# Altium PCB ADP32F036QN56Q_EVM_Rev1.1.PcbDoc
Units mm, origin at the board's own origin, x right, y up, seen from the top; angles counter-clockwise.
Board outline 85 x 53 mm, 2 copper layers (Top Layer, Bottom Layer); 90 components, 82 nets, 321 pads, 303 vias.
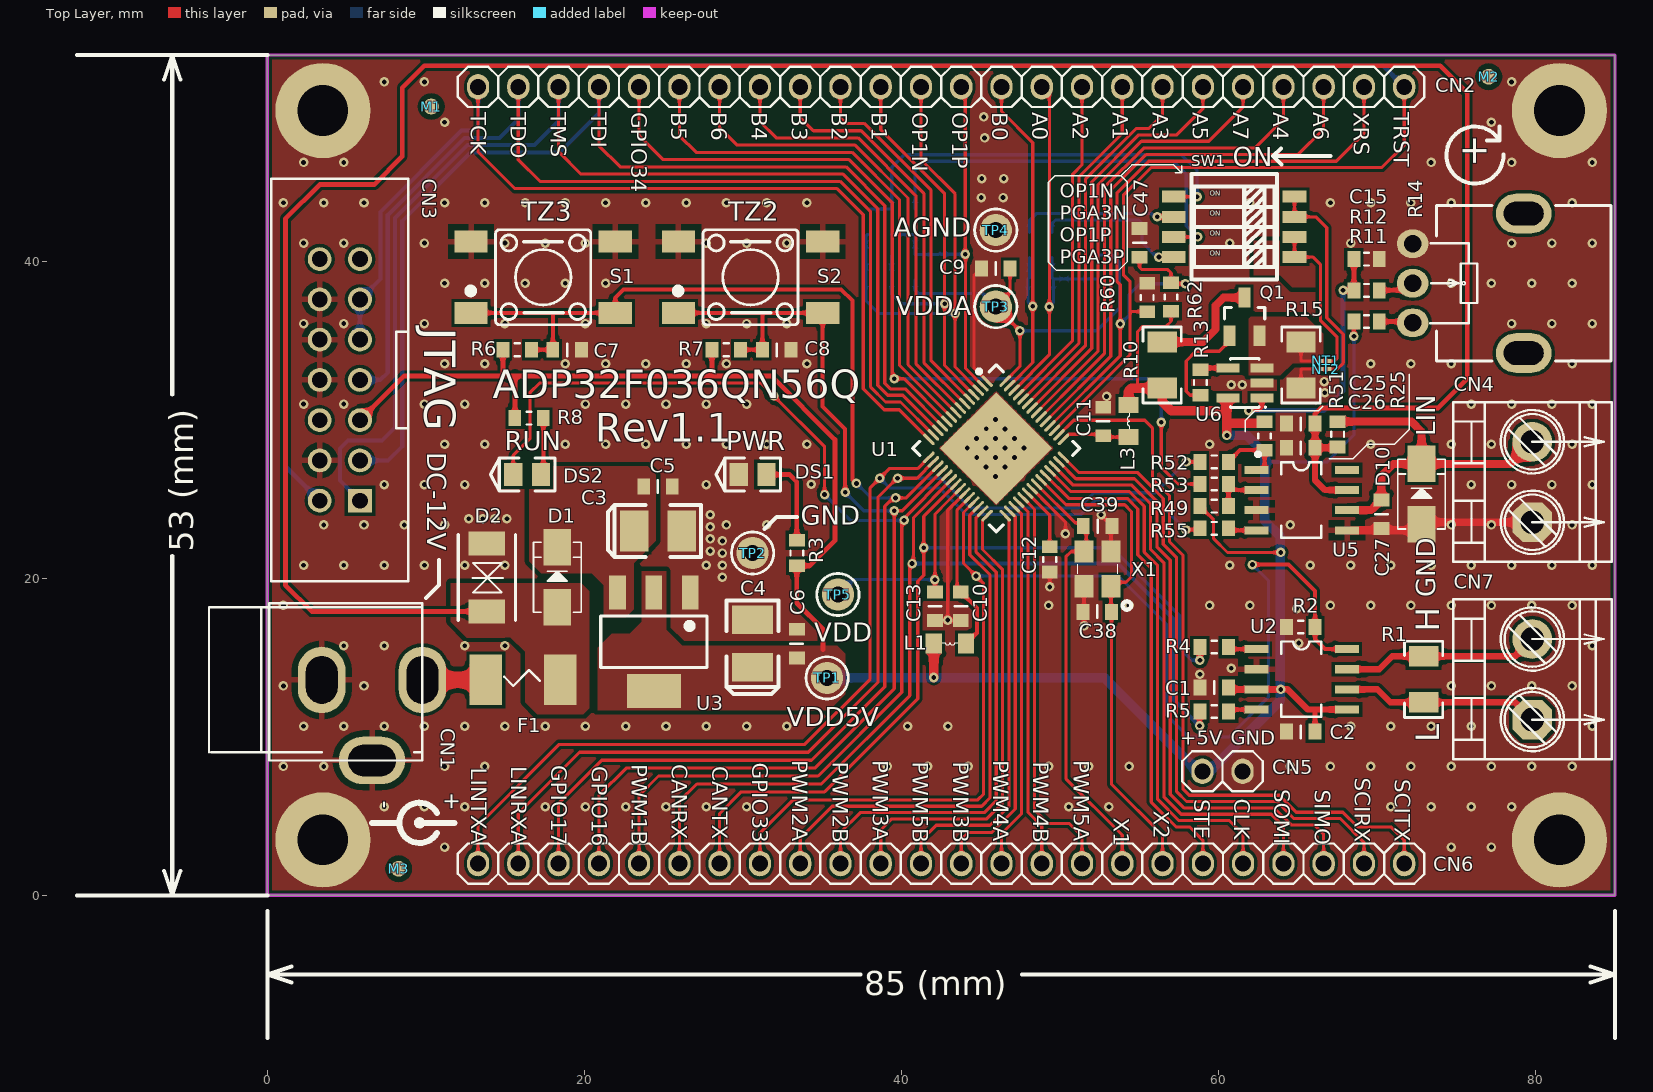
[diagram p0: Top Layer view]
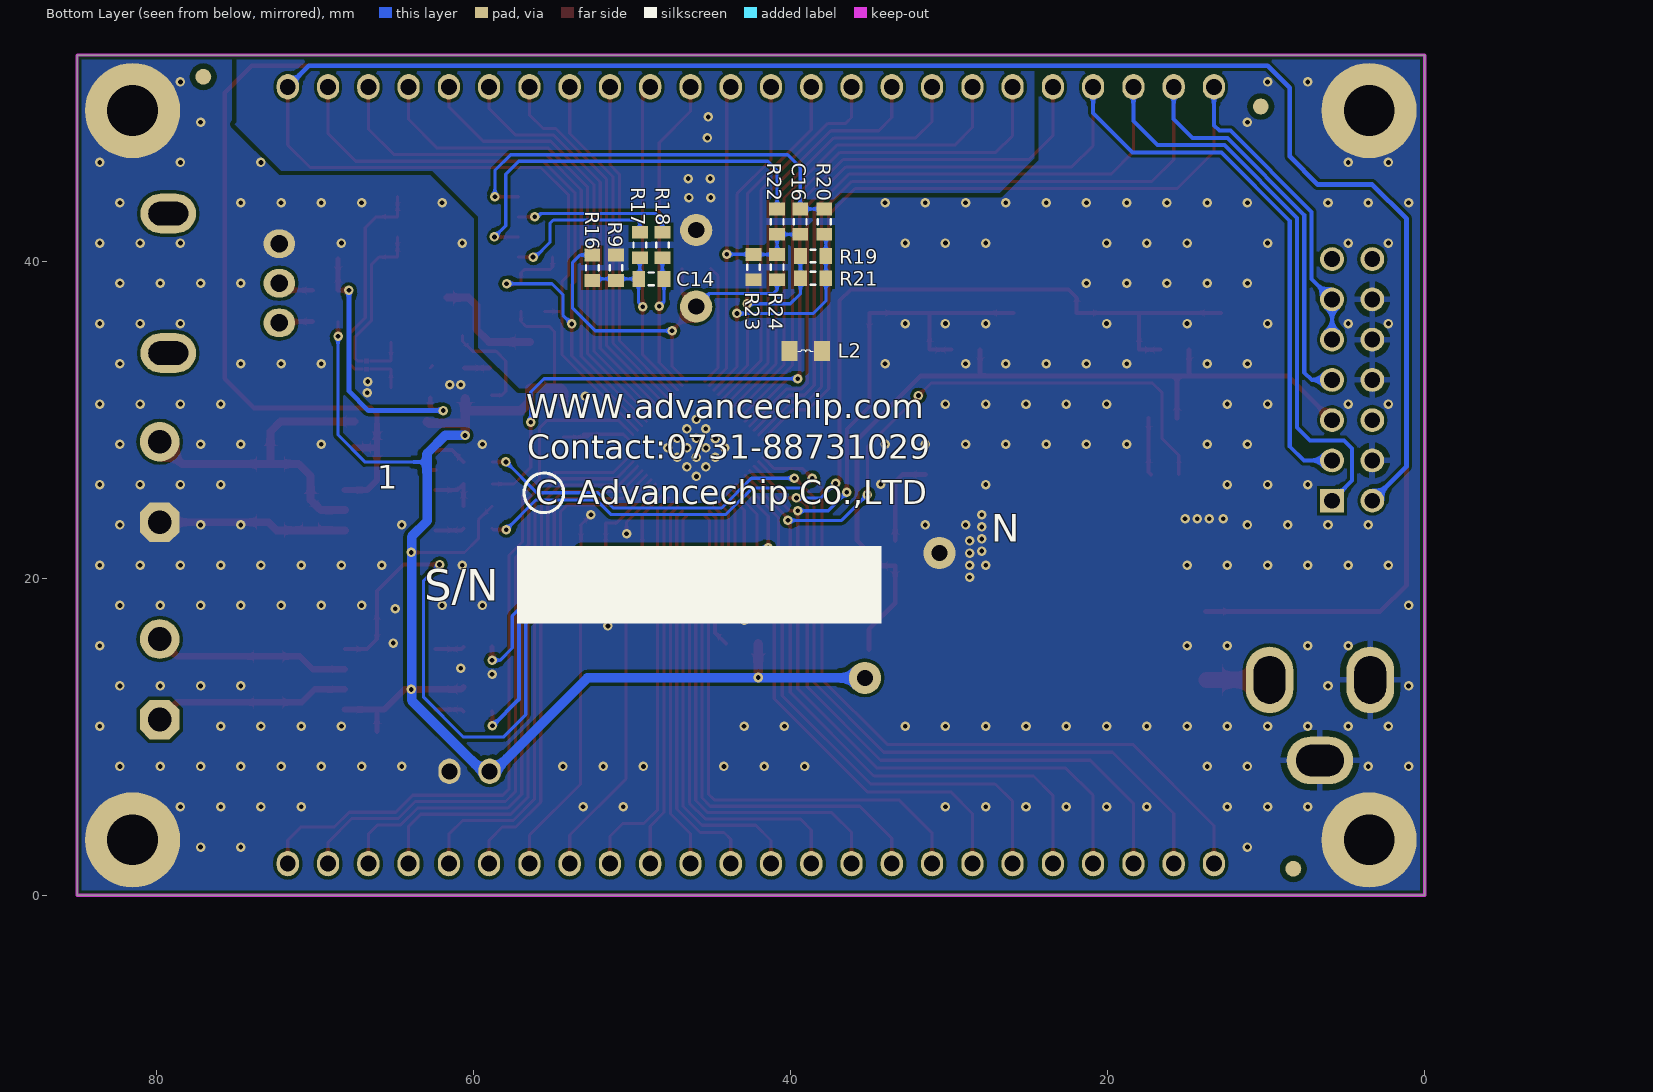
[diagram p1: Bottom Layer view, seen from below]
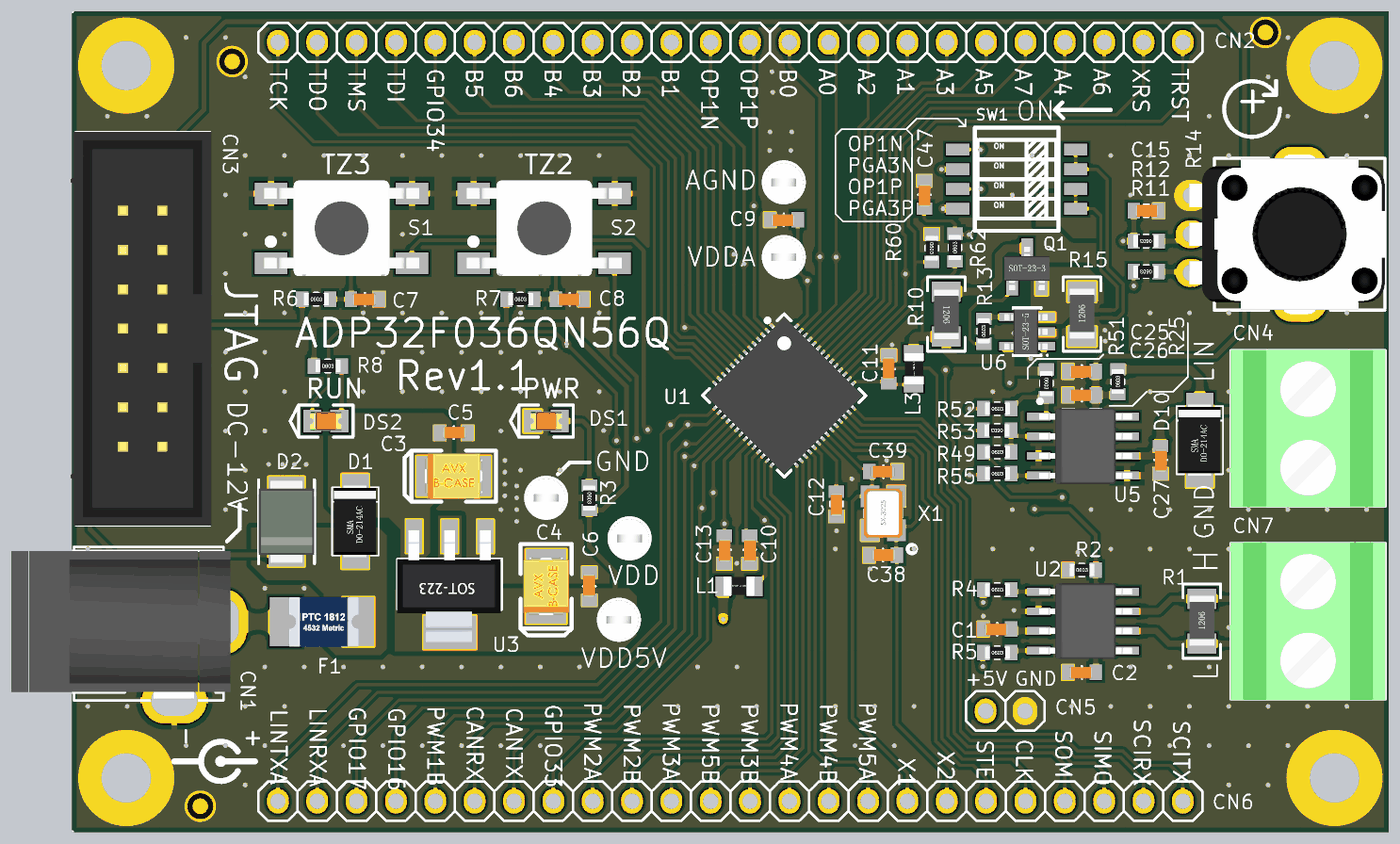
[diagram p2: 3D render of the assembled board from above, using the file's embedded part models]
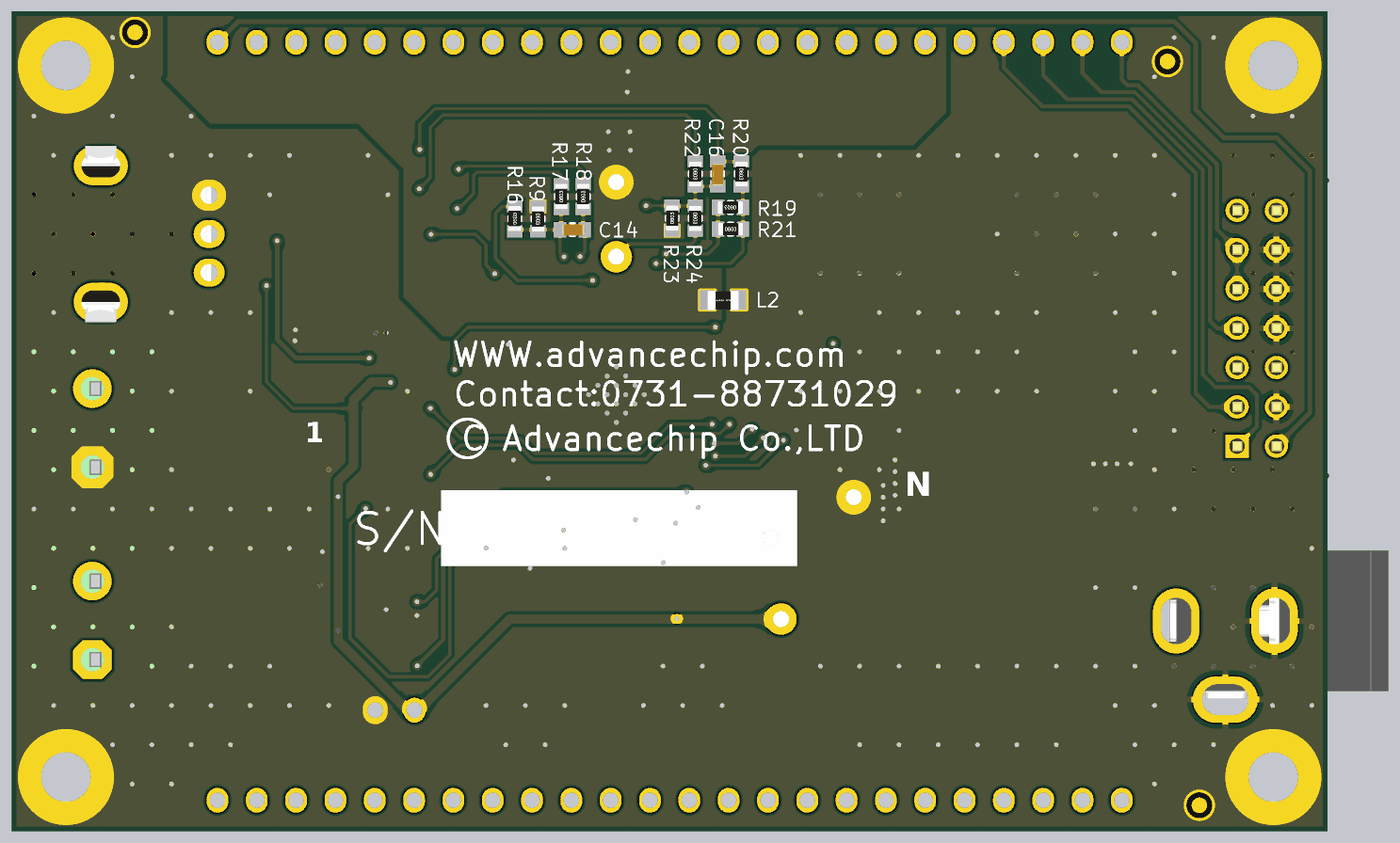
[diagram p3: 3D render of the assembled board from below, using the file's embedded part models]

## Layer stack, top to bottom
Top Solder: solder mask 0.0102, Solder Resist, Dk 3.5
Top Layer: signal copper 0.0356
Dielectric 1: dielectric 0.32, FR-4, Dk 4.8
Bottom Layer: signal copper 0.0356
Bottom Solder: solder mask 0.0102, Solder Resist, Dk 3.5

## Board outline
0,0 85,0 85,53 0,53

## Design rules (kind name [scope] priority, off if disabled: settings)
Clearance Clearance_U1 [InComponent('U1')] p1: gap=0.152 ignorepadtopadclearanceinfootprint=TRUE except(0.381: SMDPad-Fill SMDPad-Poly SMDPad-Region)
Clearance Clearance_T1T2 [(InComponent('T1') OR InComponent('T2'))] p2: gap=0.152 ignorepadtopadclearanceinfootprint=TRUE except(0.254: SMDPad-Fill SMDPad-Poly SMDPad-Region)
Clearance [All] p3: gap=0.2 ignorepadtopadclearanceinfootprint=TRUE except(0.3: Fill-Fill Fill-Poly Fill-Region Poly-Poly Poly-Region Region-Region)
HoleSize [All] p1: absolutevalues=TRUE maxlimit=20 minlimit=0.025 maxpercent=80.000 minpercent=20.000
MinimumSolderMaskSliver [All] p1: minsoldermaskwidth=0
PlaneClearance [All] p1: clearance=0.254
PolygonConnect PolygonConnect_PAD [(HasFootprint('IDC14-W') OR HasFootprint('SIP24A') OR HasFootprint('IDC14-L') OR HasFootprint('sw-pb10') OR HasFootprint('SO-8') OR HasFootprint('SIP3A') OR HasFootprint('DC-005') OR HasFootprint('sip3'))] p1: thpad.connectstyle=Relief thpad.reliefconductorwidth=0.381 thpad.reliefentries=4 thpad.polygonreliefangle="90 Angle" thpad.airgapwidth=0.381 smdpad.connectstyle=Relief smdpad.reliefconductorwidth=0.381 smdpad.reliefentries=4 smdpad.polygonreliefangle="90 Angle" smdpad.airgapwidth=0.381 via.connectstyle=Direct via.reliefconductorwidth=0.254 via.reliefentries=4 via.polygonreliefangle="90 Angle" via.airgapwidth=0.254
PolygonConnect [All] p2: connectstyle=Direct reliefconductorwidth=0.254 reliefentries=4 polygonreliefangle="90 Angle" airgapwidth=0.254
RoutingVias [All] p1: holewidth=0.3 width=0.6 viastyle="Through Hole" minholewidth=0.3 minwidth=0.6 maxholewidth=5 maxwidth=10
SilkToBoardRegionClearance [All] p1 off:
SilkToSilkClearance [All] p1 off: silktosilkclearance=0.254
SilkToSolderMaskClearance [IsPad] p1 off: minsilkscreentomaskgap=0.254 clearancetoexposedcopper=TRUE
SolderMaskExpansion [All] p1: expansion=0.102
Width [All] p1: maxlimit=25.4 minlimit=0.127 preferedwidth=0.254 minimp=50.000000 maximp=50.000000 favimp=50.000000
24 further rules are at their usual default settings.

## Components (designator, comment, footprint, x,y, rotation, side; value= is the part's Value field where it differs from the comment)
C1 "0.1uF/50V" C0603#1 59.727,13.118 r180 top value=0.1uF
C2 "0.1uF/50V" C0603#1 65.188,10.324 r180 top value=0.1uF
C3 "47uF/16V" CASE-B_3528 24.638,22.987 r180 top
C4 "100uF/10V" CASE-B_3528 30.607,15.875 r270 top
C5 "0.1uF/50V" C0603#1 24.638,25.781 r0 top value=100pF
C6 "0.1uF/50V" C0603#1 33.401,15.875 r90 top value=100pF
C7 "DNP" C0603#1 18.912,34.417 r180 top
C8 "DNP" C0603#1 32.131,34.417 r180 top
C9 "2.2uF/25V" C0603#1 45.949,39.548 r180 top
C10 "2.2uF/25V" C0603#1 43.739,18.237 r270 top
C11 "2.2uF/25V" C0603#1 52.73,29.896 r90 top
C12 "2.2uF/25V" C0603#2 49.352,21.192 r270 top
C13 "2.2uF/25V" C0603#1 42.113,18.237 r270 top
C14 "NC" C0603#2 48.782,38.887 r180 bottom
C15 "0.1uF/50V" C0603#2 69.342,40.132 r0 top value=0.1uF
C16 "100pF/50V" C0603#2 39.389,42.494 r270 bottom
C25 "0.1uF/50V" C0603#1 65.188,29.755 r180 top value="TDK C3216X7R1V106KT000E"
C26 "2.2uF/50V" C0603#1 65.188,28.231 r180 top value="TDK C3216X7R1V106KT000E"
C27 "100pF" C0603#1 70.268,24.04 r270 top value="TDK C3216X7R1V106KT000E"
C38 "22pF/50V" C0603#1 52.349,17.882 r0 top value=100pF
C39 "22pF/50V" C0603#1 52.375,23.292 r180 top value=100pF
C47 "0.1uF/50V" C0603#1 55.016,41.159 r270 top value="TDK C3216X7R1V106KT000E"
CN1 "DC-005-20A" DC-005 9.779,13.589 r0 top
CN2 "2.54-24P" SIP24A 42.5,51 r0 top
CN3 "2.54-2X7P" IDC14-L 4.572,32.512 r90 top
CN4 "EK508V-02P" J-EK508V-02P 79.793,26.072 r90 top
CN5 "XH2.54-2P" sip2_1 60.249,7.823 r0 top
CN6 "2.54-24P" SIP24A 42.5,2 r0 top
CN7 "EK508V-02P" J-EK508V-02P 79.793,13.626 r90 top
D1 "SS14" SMA 18.288,20.066 r270 top
D2 "SMBJ18CA" SMB2 13.843,20.047 r270 top
D10 "SMAJ18CA" SMA 72.808,25.31 r270 top
DS1 "绿色LED" SMD_LED0805_LED 30.607,26.543 r0 top
DS2 "LED" SMD_LED0805_LED 16.383,26.543 r0 top
F1 "0.5A/24V" 1812_PTC_NP 16.129,13.589 r0 top
L1 "BLM21PG221SN" L-0805 43.053,15.875 r180 top value=220Ω@100MHZ
L2 "BLM21PG221SN" L-0805 39.04,34.341 r180 bottom value=220Ω@100MHZ
L3 "BLM21PG221SN" L-0805 54.331,29.921 r90 top value=220Ω@100MHZ
M1 "" Mark1 10.338,49.759 r0 top
M2 "" Mark1 77.038,51.638 r0 top (schematic designator M1)
M3 "" Mark1 8.28,1.676 r0 top (schematic designator M1)
NT1 "Net-Tie" Net-Tie_10mil 66.751,33.706 r180 top net-tie
NT2 "Net-Tie" Net-Tie_10mil 66.751,33.198 r180 top net-tie
Q1 "FDV301N" MOS-SOT23 61.646,36.5 r0 top
R1 "120R" 1206RX 72.935,13.626 r90 top
R2 "10K" R0603#1 65.188,16.928 r0 top value=1K
R3 "2.2KΩ" R0603#2 33.401,21.59 r270 top value=1K
R4 "100R" R0603#1 59.727,15.658 r0 top
R5 "100R" R0603#1 59.727,11.594 r0 top
R6 "10KΩ" R0603#1 15.759,34.417 r0 top value=1K
R7 "10KΩ" R0603#1 28.945,34.417 r0 top value=1K
R8 "2.2KΩ" R0603#1 16.51,30.099 r0 top value=1K
R9 "30K" R0603#2 51.003,39.587 r270 bottom value=1K
R10 "10Ω" 1206RX 56.439,33.452 r270 top value=1K
R11 "500KΩ" R0603#2 69.342,36.195 r180 top value=1K
R12 "1KΩ" R0603#2 69.342,38.163 r180 top value=1K
R13 "1KΩ" R0603#2 58.852,32.347 r90 top value=1K
R14 "RK09K1130A6S  10KΩ" RK09K1130 79.248,38.608 r270 top
R15 "5Ω" 1206RX 65.202,33.452 r90 top value=1K
R16 "30K" R0603#2 52.502,39.587 r90 bottom value=1K
R17 "1K" R0603#2 49.505,41.021 r90 bottom
R18 "0R" R0603#2 48.082,41.021 r90 bottom value=1K
R19 "30KΩ" R0603#2 38.571,40.324 r0 bottom value=1K
R20 "1KΩ" R0603#2 37.871,42.494 r270 bottom value=1K
R21 "30KΩ" R0603#2 38.571,38.924 r180 bottom value=1K
R22 "1KΩ" R0603#2 40.843,42.494 r270 bottom value=1K
R23 "30KΩ" R0603#2 42.342,39.624 r90 bottom value=1K
R24 "30KΩ" R0603#2 40.843,39.624 r270 bottom value=1K
R25 "NC" R0603#2 67.513,29.082 r90 top
R49 "10K" R0603#1 59.727,24.548 r0 top
R51 "10K" R0603#1 62.902,28.982 r270 top
R52 "100R" R0603#1 59.727,27.342 r0 top
R53 "100R" R0603#1 59.727,25.945 r180 top
R55 "100R" R0603#1 59.727,23.151 r0 top
R60 "2.2KΩ" R0603#1 55.499,37.719 r270 top value=1K
R62 "10K" R0603#1 56.998,37.744 r90 top
S1 "6x6x5" sw-pb10 17.399,38.989 r0 top
S2 "6x6x5" sw-pb10 30.48,38.989 r0 top
SW1 "DSHP04TS-S" SW-SMD_8P-L6.7-W5.4-P1.27-LS8.5 60.985,42.164 r90 top
TP1 "3V3" Keystone5002 35.306,13.716 r0 top
TP2 "GND" Keystone5002 30.607,21.59 r0 top
TP3 "GND" Keystone5002 45.949,37.135 r0 top
TP4 "GND" Keystone5002 45.949,41.961 r0 top
TP5 "GND" Keystone5002 35.992,18.974 r0 top
U1 "ADP32F036QN56Q" QFN56-7X7-04P 45.974,28.194 r315 top
U2 "MCP2562FD-E/SN" SO-8 65.251,13.626 r270 top
U3 "AMS1117-5V" SOT-223 24.384,16.002 r180 top
U5 "TJA1021T/20/CM,118" SO-8 65.252,24.929 r270 top
U6 "LMV321ILT" SOT-25 61.646,32.309 r90 top
X1 "10MHz" XTAL_3225 52.363,20.592 r90 top

## Footprints (in the part's own frame and the unit in brackets; to place one, negate y for a bottom-side part, rotate by r counter-clockwise, add the part's x,y. Pads: shape width x height; smd on the part's side, far side on the other; paste and mask are expansions set on the pad)
1206RX [mm]
  rect 1.3x1.85 smd: 1(-1.45,0) 2(1.45,0)
  silkscreen extent -2.4,-1.21 2.4,1.21, body extent -1.57,-0.8 1.63,0.8, height 0.6
1812_PTC_NP [mil]
  rect 80x125 smd: 1(-92.5,0) 2(92.5,0)
  silkscreen extent -47,-15 42,25, body extent -84,-63 94,63, height 20
C0603#1 [mm] "无丝印"
  rect 0.8x1 smd mask+0.051: 1(-0.9,0) 2(0.9,0)
  silkscreen extent 0,-0.39 0,0.41, body extent -0.71,-0.36 0.81,0.41, height 0.68
C0603#2 [mm]
  rect 0.8x1 smd mask+0.051: 1(-0.8,0) 2(0.8,0)
  silkscreen extent -0.15,-0.4 0.15,0.4, body extent -0.71,-0.38 0.81,0.38, height 0.68
CASE-B_3528 [mm]
  rect 1.8x2.6 smd: 1(1.5,0) 2(-1.5,0)
  silkscreen extent -2.73,-1.65 3.16,1.65, body extent -1.85,-1.47 1.85,1.46, height 2.03
DC-005 [mm] "接口大小9X11MM    5.5-2.1mm"
  oval 3x4.2 hole 2 slot 3 at 90 deg: 1(0,0) 3(-6.35,0)
  oval 4.2x3 hole 2 slot 3 at 0 deg: 2(-3.175,-5.08)
  silkscreen extent -13.46,-5.08 0,4.83, body extent -13.7,-5.02 0.45,4.56, height 11
IDC14-L [mm]
  rect 1.5x1.5 hole 1: 1(-7.62,-1.27)
  round 1.5 hole 1: 2(-7.62,1.27) 3(-5.08,-1.27) 4(-5.08,1.27) 5(-2.54,-1.27) 6(-2.54,1.27) 7(0,-1.27) 8(0,1.27) 9(2.54,-1.27) 10(2.54,1.27) 11(5.08,-1.27) 12(5.08,1.27) 13(7.62,-1.27) 14(7.62,1.27)
  silkscreen extent -12.7,-4.32 12.7,4.32, body extent -12.72,-4.44 12.72,4.67, height 9.1
J-EK508V-02P [mm]
  oct 2.5x2.5 hole 1.5: 1(-2.54,0)
  round 2.5 hole 1.5: 2(2.54,0)
  silkscreen extent -5.04,-5 5.04,5, body extent -5.08,-5 5.08,5, height 13.8
Keystone5002 [mil] "测试点"
  round 80 hole 40: 1(0,0)
  silkscreen extent -52,-52 52,52, body extent -49,-49 49,49, height 182
L-0805 [mil] "标准型  间距40mil 电感"
  rect 40x50 smd: 1(-40,0) 2(40,0)
  silkscreen extent -20,-3 19,3, body extent -39,-26 39,24, height 36
Mark1 [mm] "基准点 无边框"
  round 1 all layers, no hole: 0(0,0)
MOS-SOT23 [mm] "焊盘加长型"
  rect 0.762x1.27 smd: D(0,1.2) G(-0.95,-1.2) S(0.95,-1.2)
  silkscreen extent -1.27,-0.15 1.27,0.58, body extent -1.45,-1.5 1.45,1.3, height 1.2
Net-Tie_10mil [mil]
  rect 10x10 smd paste-5 mask-5: 1(10,0) 2(-10,0)
  Top Layer region: 6,-5 -6,-5 -6,5 6,5
QFN56-7X7-04P [mm]
  rect 5x5 smd mask+0.051: 0(0,0)
  oval 0.95x0.2 smd mask+0.051: 1(-3.4,2.6) 2(-3.4,2.2) 3(-3.4,1.8) 4(-3.4,1.4) 5(-3.4,1) 6(-3.4,0.6) 7(-3.4,0.2) 8(-3.4,-0.2) 9(-3.4,-0.6) 10(-3.4,-1) 11(-3.4,-1.4) 12(-3.4,-1.8) 13(-3.4,-2.2) 14(-3.4,-2.6) 29(3.4,-2.6) 30(3.4,-2.2) 31(3.4,-1.8) 32(3.4,-1.4) 33(3.4,-1) 34(3.4,-0.6) 35(3.4,-0.2) 36(3.4,0.2) 37(3.4,0.6) 38(3.4,1) 39(3.4,1.4) 40(3.4,1.8) 41(3.4,2.2) 42(3.4,2.6)
  oval 0.2x0.95 smd mask+0.051: 15(-2.6,-3.4) 16(-2.2,-3.4) 17(-1.8,-3.4) 18(-1.4,-3.4) 19(-1,-3.4) 20(-0.6,-3.4) 21(-0.2,-3.4) 22(0.2,-3.4) 23(0.6,-3.4) 24(1,-3.4) 25(1.4,-3.4) 26(1.8,-3.4) 27(2.2,-3.4) 28(2.6,-3.4) 43(2.6,3.4) 44(2.2,3.4) 45(1.8,3.4) 46(1.4,3.4) 47(1,3.4) 48(0.6,3.4) 49(0.2,3.4) 50(-0.2,3.4) 51(-0.6,3.4) 52(-1,3.4) 53(-1.4,3.4) 54(-1.8,3.4) 55(-2.2,3.4) 56(-2.6,3.4)
  silkscreen extent -4.32,-3.72 3.73,3.73, body extent -3.65,-3.65 3.66,3.66, height 1
R0603#1 [mm] "无丝印 加长型，脚距1.8mm"
  rect 0.8x1 smd mask+0.051: 1(-0.9,0) 2(0.9,0)
  silkscreen extent -0.15,-0.4 0.15,0.4, body extent -0.79,-0.4 0.81,0.4, height 0.43
R0603#2 [mm]
  rect 0.8x1 smd mask+0.051: 1(-0.8,0) 2(0.8,0)
  silkscreen extent -0.15,-0.4 0.15,0.4, body extent -0.79,-0.4 0.81,0.4, height 0.43
RK09K1130 [mm] "立式可调电位器"
  oval 2.5x3.5 hole 1.5 slot 2.5 at 90 deg: 0(-4.4,0) 0(4.4,0)
  oval 1.8x2 hole 1.1: 1(-2.5,-7) 2(0,-7) 3(2.5,-7)
  silkscreen extent -4.9,-5.88 4.9,5.5, body extent -5.7,-7.15 5.7,5.5, height 19.5
sip2_1 [mm]
  oval 1.4x1.6 hole 1.016 paste-0.102: 1(-1.27,0) 2(1.27,0)
  silkscreen extent -2.54,-1.27 2.54,1.27
SIP24A [mm]
  oval 1.4x1.6 hole 1: 1(-29.21,0) 2(-26.67,0) 3(-24.13,0) 4(-21.59,0) 5(-19.05,0) 6(-16.51,0) 7(-13.97,0) 8(-11.43,0) 9(-8.89,0) 10(-6.35,0) 11(-3.81,0) 12(-1.27,0) 13(1.27,0) 14(3.81,0) 15(6.35,0) 16(8.89,0) 17(11.43,0) 18(13.97,0) 19(16.51,0) 20(19.05,0) 21(21.59,0) 22(24.13,0) 23(26.67,0) 24(29.21,0)
  silkscreen extent -30.48,-1.27 30.48,1.27
SMA [mm] "DO-214AC"
  rect 2.3x1.75 smd: 1(1.9,0) 2(-1.9,0)
  silkscreen extent -2.2,-1.5 2.2,1.5, body extent -2.3,-1.37 2.3,1.33, height 2.4
SMB2 [mm] "双向TVS"
  rect 1.52x2.3 smd: 1(-2.14,0) 2(2.14,0)
  silkscreen extent -2.7,-1.8 2.7,1.8, body extent -2.7,-1.8 2.7,1.8, height 2.3
SMD_LED0805_LED [mm]
  rect 1.16x1.47 smd: 1(0.875,0) 2(-0.875,0)
  silkscreen extent -2.3,-1.04 1.75,1.04, body extent -1.01,-0.62 1.01,0.62, height 1.1
SO-8 [mil]
  rect 20x60 smd: 1(-75,-112.5) 2(-25,-112.5) 3(25,-112.5) 4(75,-112.5) 5(75,112.5) 6(25,112.5) 7(-25,112.5) 8(-75,112.5)
  silkscreen extent -94,-52 93,49, body extent -96,-111 96,125, height 64
SOT-25 [mm]
  rect 0.55x1.45 smd: 1(-0.942,-1.085) 2(0.008,-1.085) 3(0.958,-1.085) 4(0.958,1.065) 5(-0.942,1.065)
  silkscreen extent -1.57,-1.36 1.56,0.89, body extent -1.45,-1.32 1.45,1.48, height 1.2
SOT-223 [mm] "SOT-223/SC-73; 4 Leads; Body 6.7 x 7.3 mm, inc. leads (LxW max)"
  rect 1.05x2.15 smd: 1(-2.3,-3.1) 2(0,-3.1) 3(2.3,-3.1)
  rect 3.4x2.15 smd: 2(0,3.1)
  silkscreen extent -3.35,-1.63 3.35,1.63, body extent -3.3,-3.5 3.4,3.71, height 1.85
sw-pb10 [mm] "SMD"
  rect 2.1x1.4 smd: 1(-4.55,-2.25) 2(4.55,-2.25) 3(4.55,2.25) 4(-4.55,2.25)
  silkscreen extent -4.77,-3 3,3, body extent -5,-3 5,3, height 4.97
SW-SMD_8P-L6.7-W5.4-P1.27-LS8.5 [mm]
  rect 0.762x1.5 smd: 1(-1.905,-3.81) 2(-0.635,-3.81) 3(0.635,-3.81) 4(1.905,-3.81) 5(1.905,3.81) 6(0.635,3.81) 7(-0.635,3.81) 8(-1.905,3.81)
  silkscreen extent -3.33,-2.7 3.33,2.7, body extent -3.3,-3.81 3.3,3.81, height 1
XTAL_3225 [mm] "3225晶振"
  rect 1.4x1.2 smd mask+0.051: 1(-1.1,-0.85) 2(1.1,-0.85) 3(1.1,0.85) 4(-1.1,0.85)
  silkscreen extent -2.58,-2.12 0.3,1.25, body extent -1.6,-1.25 1.6,1.25, height 0.81

## Part data
C1 C2 C5 C6 C7 C8 C14 C15 C16 C25 C26 C27 C47: library part Cap, "贴片电容", LatestRevisionDate=17-Jul-2002, LatestRevisionNote="Re-released for DXP Platform.", Published=8-Jun-2000, Publisher="Altium Limited"
C3 C4: library part CAP2, "钽电容", Tolerance error=10%, Brand Name=三星, cost=￥0.01
C9 C10 C11 C12 C13: library part C, "贴片电容"
C38 C39: library part Cap, "COG贴片电容", LatestRevisionDate=17-Jul-2002, LatestRevisionNote="Re-released for DXP Platform.", Published=8-Jun-2000, Publisher="Altium Limited"
CN1: library part DC-005, "DC电源接口，内径2.1mm", LatestRevisionDate=17-Jul-2002, LatestRevisionNote="Re-released for DXP Platform.", Published=24-Mar-1999, Publisher="Altium Limited"
CN2 CN6: library part CON24A, "连接器"
CN3: library part Receptacle_7X2, "简易牛角座连接器 卧式"
CN4 CN7: library part CON2A, "连接器"
CN5: library part CON2, "连接器"
D1: library part "D Schottky", "肖特基二极管", Code_JEDEC=DO-214-AA, LatestRevisionDate=17-Jul-2002, LatestRevisionNote="Re-released for DXP Platform.", Published=8-Jun-2000, Publisher="Altium Limited"
D2 D10: library part TVS, "TVS二极管", LatestRevisionDate=17-Jul-2002, LatestRevisionNote="Re-released for DXP Platform.", Published=8-Jun-2000, Publisher="Altium Limited"
DS1: library part LED0, "发光二极管", LatestRevisionDate=08-Jul-2005, LatestRevisionNote="Mech Layer 1 removed.", PackageDescription="LED; 2 Leads", PackageReference=LED-0, Published=8-Jun-2000, Publisher="Altium Limited"
DS2: library part LED0, "红色发光二极管", LatestRevisionDate=08-Jul-2005, LatestRevisionNote="Mech Layer 1 removed.", PackageDescription="LED; 2 Leads", PackageReference=LED-0, Published=8-Jun-2000, Publisher="Altium Limited"
F1: library part "Fuse Thermal", "自恢复保险丝", LatestRevisionDate=17-Jul-2002, LatestRevisionNote="Re-released for DXP Platform.", PackageReference=PIN-W2/E2.8, Published=24-Mar-1999, Publisher="Altium Limited"
L1 L2 L3: library part FB1, "贴片电感BLM21PG221SN", Code_IEC=1005, Code_JEITA=0402, LatestRevisionDate=29-May-2009, LatestRevisionNote="IPC-7351 Footprint Added.", PackageDescription="Chip Inductor", PackageReference=0402-A, Published=8-Jun-2000, Publisher="Altium Limited"
M1 M2 M3: library part CMP-0077181-1, "MARK点"
NT1 NT2: library part CMP-0078142-1, "PCB网络短接点", Manufacturer=N/A, CompType=Net-Tie, MountType=SMT, PackageReference=N/A, PartNumber=N/A
Q1: library part 2SK3019, "N-MOSFET", LatestRevisionDate=17-Jul-2002, LatestRevisionNote="Re-released for DXP Platform.", Published=8-Jun-2000, Publisher="Altium Limited"
R1 R2 R3 R6 R7 R8 R9 R10 R11 R12 R13 R15 R16 R17 R18 R19 R20 R21 R22 R23 R24 R60: library part Res, "贴片电阻", LatestRevisionDate=17-Jul-2002, LatestRevisionNote="Re-released for DXP Platform.", Published=8-Jun-2000, Publisher="Altium Limited"
R4 R5 R25 R49 R51 R52 R53 R55 R62: library part 10K/1%, "------", Add into BOM=yes, Convert to PCB=yes, Design Item ID=Res, Device=10K/1%, LatestRevisionDate=17-Jul-2002, LatestRevisionNote="Re-released for DXP Platform.", Origin Footprint=0603R-X, Published=8-Jun-2000, Publisher="Altium Limited", Symbol=Res
  R4 R5 R52 R53 R55: Name=1K
  R25 R49 R51 R62: Name=10K
R14: library part "RPot SM", "立式可调电位器", DatasheetDocument=Oct-2003, Published=17-Dec-2003, Publisher="Altium Limited"
S1 S2: library part SW6X6X5mm, "贴片轻触开关 6x6x5mm"
SW1: Current Rating=25mA, JLCPCB Part Class="Extended Part", Voltage Rating=24V, Add into BOM=yes, Convert to PCB=yes, Datasheet=https://atta.szlcsc.com/upload/public/pdf/source/20211009/11BE85C99D2C85B0991AF4F9D6EB8BDE.pdf, Device=DSHP04TS-S, Lead Pitch=1.27mm, Manufacturer Part=DSHP04TS-S, Name=DSHP04TS-S, Number of Positions=4, Supplier=LCSC, Supplier Footprint=SMD-8P,5.4x6.7mm, Supplier Part=C319050, Symbol=DSHP04TS-S
TP1 TP2 TP3 TP4 TP5: library part TP, "测试点"
U1: "进芯32位DSP"
U2: library part SN65HVD230D, "3.3V CAN FDͨѶ"
U3: library part ASM1117-3.3V, "线性稳压器(输入耐压18V)"
U5: JLCPCB Part Class="Extended Part", Operating Temperature=-, supply voltage="5.5V ~ 27V", Add into BOM=yes, Convert to PCB=yes, Datasheet=https://atta.szlcsc.com/upload/public/pdf/source/20170914/C128810_1505359876382968052.pdf, Device=TJA1021T/20/CM,118, LCSC Part Name=TJA1021T/20/CM,118, Manufacturer Part=TJA1021T/20/CM,118, Name=TJA1021T/20/CM,118, Protocol=LINbus, Receiver Hysteresis=175mV, Supplier=LCSC, Supplier Footprint=SOIC-8, Supplier Part=C128810, Symbol=TJA1021T/20/CM,118
U6: library part LM321, "运放"
X1: library part 3TJ410000ZYLBC, "无源晶振", Equivalent Series Resistance (ESR)=150Ω, External load capacitor=20pF, Frequency Stability(Full temperature range)=±30ppm, JLCPCB Part Class="Extended Part", LCSC Part Name="10MHz ±10ppm 20pF", Manufacturer=JYJE(晶友嘉), Normal temperature Frequency Tolerance=±10ppm, Operating Temperature=-40℃~+85℃, Add into BOM=yes, Convert to PCB=yes, Crystal Type=贴片晶振, Datasheet=https://atta.szlcsc.com/upload/public/pdf/source/20210922/C2898998_79DA4CA19A36528DCEC4420D32E637EE.pdf, Device=3TJ410000ZYLBC, Manufacturer Part=3TJ410000ZYLBC, Name=10MHz, Supplier=LCSC, Supplier Footprint=SMD3225-4P, Supplier Part=C2898998, Symbol=3TJ410000ZYLBC

## Free pads (board coordinates)
  round 6 hole 3.2: 1(3.5,3.5) 1(3.5,49.5) 1(81.5,3.5) 1(81.5,49.5)

## Via types
v1: diameter 0.6, hole 0.3, Top Layer to Bottom Layer, tented both sides, 302 vias
v2: diameter 0.6, hole 0.3, Top Layer to Bottom Layer, 1 vias

## Nets (pads, with @x,y where several pads share a name; then routed paths per layer and width w, separated by ;. In a path a pad name is that pad's centre, name@x,y a point inside that pad or via, vN(x,y) a via of type N, cw(c..) or ccw(c..) an arc to the next point about the centre after c; other vN are vias at no path point)
A0: C14.1 CN2.15 R9.2 R16.1 R17.1 U1.54 | length 26.4
  Top Layer w0.2: U1.54 49.327,34.092 v1(49.327,37.135) 49.327,50.523 CN2.15
  Bottom Layer w0.2: v1(49.327,37.135) 49.582,37.39 C14.1 ; R17.1 49.505,38.965 C14.1 ; R16.1 52.402,38.887 C14.1
A1: CN2.17 U1.52 | length 22.3
  Top Layer w0.2: U1.52 51.2,34.835 51.2,34.962 51.197,34.966 51.197,45.326 53.93,48.059 CN2.17
A2: CN2.16 U1.53 | length 21.1
  Top Layer w0.2: U1.53 50.797,34.997 50.797,45.492 51.39,46.084 CN2.16
A3: CN2.18 U1.51 | length 24
  Top Layer w0.2: U1.51 51.6,34.669 51.6,35.128 51.597,35.131 51.597,45.16 54.805,48.368 55.607,48.368 56.47,49.231 CN2.18
A4: CN2.21 U1.48 | length 31.3
  Top Layer w0.2: U1.48 51.25,32.621 52.8,34.172 52.8,35.625 52.797,35.628 52.797,44.663 55.27,47.136 62.287,47.136 64.09,48.939 CN2.21
A5: CN2.19 U1.50 | length 26.1
  Top Layer w0.2: U1.50 52,34.503 52,35.294 51.997,35.297 51.997,44.995 54.971,47.968 57.366,47.968 59.01,49.612 CN2.19
A6: CN2.22 U1.47 | length 34
  Top Layer w0.2: U1.47 53.2,34.006 53.2,35.791 53.197,35.794 53.197,36.291 53.2,36.294 53.2,44.501 53.213,44.501 55.449,46.736 65.024,46.736 66.63,48.342 CN2.22
A7: CN2.20 U1.49 | length 28.4
  Top Layer w0.2: U1.49 52.4,34.338 52.4,35.46 52.397,35.463 52.397,44.829 55.136,47.568 59.379,47.568 61.55,49.739 CN2.20
AGND: C9.2 L2.1 R9.1 R23.1 TP4.1 U1.1 | length 7.7
  Top Layer w0.2: C9.2 44.577,39.076 44.577,33.268 U1.1
  other v1: 45.034,44.018 46.406,44.018 45.06,45.212 46.457,45.212 45.237,47.777 45.187,49.098
B0: C14.2 CN2.14 R18.1 U1.55 | length 23.5
  Top Layer w0.2: CN2.14 46.31,49.448 48.279,47.479 v1(48.279,37.154) 48.279,33.61 U1.55
  Bottom Layer w0.2: R18.1 48.082,38.987 C14.2 47.982,37.451 v1(48.279,37.154)
B1: CN2.11 R19.2 R21.1 U1.4 | length 27.8
  Top Layer w0.2: CN2.11 38.69,48.294 42.723,44.261 v1(42.723,37.313) 42.723,33.425 U1.4
  Bottom Layer w0.2: R19.2 R21.1 39.371,37.946 40.005,37.313 v1(42.723,37.313)
B2: CN2.10 U1.5 | length 23.7
  Top Layer w0.2: CN2.10 36.15,49.067 36.525,48.692 37.645,48.692 41.867,44.47 41.867,33.715 U1.5
B3: CN2.9 U1.6 | length 26
  Top Layer w0.2: CN2.9 33.61,49.067 34.442,48.235 37.456,48.235 41.41,44.281 41.41,33.607 U1.6
B4: CN2.8 U1.7 | length 28.5
  Top Layer w0.2: CN2.8 31.07,48.813 32.106,47.777 37.267,47.777 40.91,44.134 40.91,33.541 U1.7
B5: CN2.6 U1.9 | length 33.7
  Top Layer w0.2: CN2.6 25.99,47.924 27.051,46.863 36.888,46.863 39.878,43.873 39.878,33.441 U1.9
B6: CN2.7 U1.8 | length 31.1
  Top Layer w0.2: CN2.7 28.53,48.432 29.642,47.32 37.077,47.32 40.41,43.987 40.41,33.475 U1.8
CAN_H: CN7.2 R1.2 U2.7 | length 12.5
  Top Layer w0.4: U2.7 70.141,14.261 70.956,15.076 R1.2 78.703,15.076 CN7.2
CAN_L: CN7.1 R1.1 U2.6 | length 12.5
  Top Layer w0.4: U2.6 70.014,12.991 70.829,12.176 R1.1 78.703,12.176 CN7.1
CLKB: CN6.20 U1.39 | length 33.9
  Top Layer w0.2: U1.39 50.672,25.476 54.37,25.476 55.308,24.538 55.308,21.653 56.153,20.809 56.153,6.049 57.484,4.718 60.687,4.718 61.55,3.855 CN6.20
GND: C1.2 C2.2 C3.2 C4.2 C5.2 C6.2 C7.1 C8.1 C10.2 C11.2 C12.2 C13.2 C15.2 C25.2 C26.2 C27.2 C38.1 C39.1 C47.1 CN1.2 CN1.3 CN3.4 CN3.8 CN3.10 CN3.12 CN4.1 CN5.2 D2.1 D10.1 DS1.2 L2.2 NT2.1 pad.1 R2.1 R14.1 R15.1 R60.1 S1.3 S1.4 S2.3 S2.4 TP2.1 U1.0 U1.23 U1.35 U2.2 U3.1 U5.3 U5.5 U6.2 X1.2 X1.4 | length 34.2
  Top Layer w0.2: C13.2 C10.2 ; v1(42.913,17.361) 42.913,24.285 U1.23 ; U1.35 50.343,23.542 v1(50.343,22.809) ; v1(49.352,19.456) C12.2 ; v1(51.513,16.995) X1.4 ; v1(52.589,24.003) 53.249,23.343 53.213,23.306 X1.2 ; R15.1 65.202,33.198 NT2.1
  Top Layer w0.5: U5.5 72.422,23.024 D10.1 72.93,23.532 CN4.1
  other v1: 11.176,3.048 74.676,3.048 77.216,3.048 7.366,5.588 9.906,5.588 12.446,5.588 17.526,5.588 20.066,5.588 22.606,5.588 25.146,5.588 27.686,5.588 30.226,5.588 50.546,5.588 53.086,5.588 70.866,5.588 73.406,5.588 75.946,5.588 78.486,5.588 1.016,8.128 3.556,8.128 11.176,8.128 13.716,8.128 39.116,8.128 41.656,8.128 44.196,8.128 49.276,8.128 51.816,8.128 54.356,8.128 64.516,8.128 67.056,8.128 69.596,8.128 72.136,8.128 74.676,8.128 77.216,8.128 79.756,8.128 82.296,8.128 2.286,10.668 4.826,10.668 7.366,10.668 9.906,10.668 12.446,10.668 14.986,10.668 17.526,10.668 20.066,10.668 22.606,10.668 25.146,10.668 27.686,10.668 30.226,10.668 32.766,10.668 40.386,10.668 42.926,10.668 68.326,10.668 70.866,10.668 73.406,10.668 75.946,10.668 83.566,10.668 1.016,13.208 6.096,13.208 74.676,13.208 77.216,13.208 79.756,13.208 82.296,13.208 58.826,13.945 60.808,14.326 4.826,15.748 7.366,15.748 12.446,15.748 14.986,15.748 83.566,15.748 65.061,15.912 64.934,18.071 1.016,18.288 49.276,18.288 54.356,18.288 59.436,18.288 61.976,18.288 67.056,18.288 69.596,18.288 72.136,18.288 74.676,18.288 77.216,18.288 79.756,18.288 82.296,18.288 28.702,20.066 2.286,20.828 4.826,20.828 7.366,20.828 9.906,20.828 12.446,20.828 14.986,20.828 27.686,20.828 28.702,20.828 60.706,20.828 65.786,20.828 68.326,20.828 70.866,20.828 73.406,20.828 75.946,20.828 78.486,20.828 81.026,20.828 83.566,20.828 28.702,21.59 27.94,21.717 28.702,22.352 27.94,22.479 27.94,23.241 3.556,23.368 6.096,23.368 8.636,23.368 11.176,23.368 28.956,23.368 31.496,23.368 64.516,23.368 74.676,23.368 77.216,23.368 82.296,23.368 12.7,23.749 13.589,23.749 14.351,23.749 15.113,23.749 27.94,24.003 7.366,25.908 9.906,25.908 12.446,25.908 27.686,25.908 75.946,25.908 78.486,25.908 81.026,25.908 83.566,25.908 34.315,25.933 45.938,26.427 45.339,27.026 46.536,27.026 44.74,27.624 45.938,27.624 47.135,27.624 44.142,28.223 45.339,28.223 46.536,28.223 47.734,28.223 11.176,28.448 13.716,28.448 18.796,28.448 21.336,28.448 23.876,28.448 26.416,28.448 28.956,28.448 31.496,28.448 34.036,28.448 59.436,28.448 69.596,28.448 74.676,28.448 77.216,28.448 82.296,28.448 44.734,28.816 45.938,28.822 47.135,28.822 46.536,29.42 45.345,29.426 45.938,30.019 2.286,30.988 4.826,30.988 9.906,30.988 12.446,30.988 20.066,30.988 22.606,30.988 25.146,30.988 27.686,30.988 30.226,30.988 75.946,30.988 78.486,30.988 81.026,30.988 83.566,30.988 52.934,31.471 66.7,31.699 60.808,32.207 61.493,32.207 66.675,32.41 11.176,33.528 13.716,33.528 18.796,33.528 21.336,33.528 23.876,33.528 26.416,33.528 28.956,33.528 34.036,33.528 69.596,33.528 72.136,33.528 74.676,33.528 82.296,33.528 2.286,36.068 4.826,36.068 9.906,36.068 14.986,36.068 20.066,36.068 27.686,36.068 30.226,36.068 32.766,36.068 78.486,36.068 81.026,36.068 83.566,36.068 11.176,38.608 13.716,38.608 16.256,38.608 18.796,38.608 21.336,38.608 74.676,38.608 77.216,38.608 79.756,38.608 82.296,38.608 2.286,41.148 4.826,41.148 9.906,41.148 14.986,41.148 17.526,41.148 20.066,41.148 27.686,41.148 30.226,41.148 32.766,41.148 60.706,41.148 68.326,41.148 78.486,41.148 81.026,41.148 83.566,41.148 1.016,43.688 3.556,43.688 6.096,43.688 11.176,43.688 13.716,43.688 16.256,43.688 18.796,43.688 21.336,43.688 23.876,43.688 26.416,43.688 28.956,43.688 31.496,43.688 34.036,43.688 61.976,43.688 67.056,43.688 69.596,43.688 72.136,43.688 74.676,43.688 82.296,43.688 2.286,46.228 4.826,46.228 73.406,46.228 78.486,46.228 83.566,46.228 11.176,48.768 77.216,48.768 7.366,51.308 9.906,51.308 78.486,51.308
GPIO16: C8.2 CN6.4 R7.2 S2.1 S2.2 U1.18 | length 69.4
  Top Layer w0.2: CN6.4 20.91,6.305 22.63,8.025 34.53,8.025 39.548,13.042 v1(39.548,24.257) 40.057,24.257 U1.18
  Top Layer w0.254: S2.1 31.369,36.739 ; R7.2 C8.2 31.231,36.601 31.369,36.739 ; v1(36.449,25.425) 36.449,29.413 35.03,30.832 S2.2 31.369,36.739
  Bottom Layer w0.2: v1(36.449,25.425) 37.617,24.257 v1(39.548,24.257)
GPIO17: C7.2 CN6.3 R6.2 S1.1 S1.2 U1.17 | length 86.6
  Top Layer w0.2: CN6.3 18.37,5.797 21.098,8.525 34.323,8.525 38.948,13.15 38.948,24.536 39.481,25.07 v1(39.624,25.07) 40.304,25.07 U1.17
  Top Layer w0.254: S1.1 18.034,36.739 ; R6.2 C7.2 18.012,36.717 18.034,36.739 ; 36.903,26.191 36.903,37.519 36.195,38.227 22.479,38.227 21.949,37.697 S1.2 18.034,36.739
  Bottom Layer w0.2: v1(37.16,25.984) 38.075,25.07 v1(39.624,25.07)
GPIO32/CANTX: CN6.7 R4.1 U1.21 | length 55.6
  Top Layer w0.2: CN6.7 28.53,5.162 29.893,6.525 35.152,6.525 41.021,12.394 41.021,19.812 41.402,20.193 v1(41.402,21.92) 41.402,23.905 U1.21
  Top Layer w0.3: v1(58.827,14.833) R4.1
  Bottom Layer w0.2: v1(41.402,21.92) 53.258,21.92 57.552,17.627 57.552,15.6 58.319,14.833 v1(58.827,14.833)
GPIO34: CN2.5 R53.2 U1.10 | length 61.2
  Top Layer w0.2: CN2.5 23.45,47.924 24.968,46.406 36.699,46.406 39.421,43.684 39.421,32.715 v1(39.548,32.588) 40.166,32.588 U1.10 ; v1(56.388,29.845) 56.388,26.998 57.441,25.945 R53.2
  Bottom Layer w0.2: v1(39.548,32.588) 55.55,32.588 56.388,31.75 v1(56.388,29.845)
LIN_BUS: C27.1 CN4.2 D10.2 R25.2 U5.6 | length 22
  Top Layer w0.5: R25.2 72.175,29.882 72.808,29.249 D10.2 ; U5.6 69.622,24.294 C27.1 70.268,26.453 71.025,27.21 D10.2 ; CN4.2 78.391,27.21 D10.2
LINRXA: CN6.2 R52.1 U1.16 | length 66.4
  Top Layer w0.2: CN6.2 15.83,5.162 19.693,9.025 34.116,9.025 38.521,13.43 38.521,25.121 39.715,26.314 v1(39.751,26.314) 40.983,26.314 U1.16 ; v1(57.949,27.342) R52.1
  Bottom Layer w0.2: v1(39.751,26.314) 42.469,26.314 44.348,24.435 51.181,24.435 52.146,25.4 56.007,25.4 v1(57.949,27.342)
LINTXA: CN6.1 R55.1 U1.15 | length 69.9
  Top Layer w0.2: CN6.1 13.29,4.4 18.415,9.525 33.909,9.525 38.021,13.637 38.021,25.702 v1(38.633,26.314) 39.233,26.914 41.017,26.914 U1.15 ; v1(57.937,23.063) 58.739,23.063 R55.1
  Bottom Layer w0.2: v1(38.633,26.314) 39.243,25.705 42.393,25.705 44.069,24.028 51.34,24.028 52.255,24.943 56.058,24.943 v1(57.937,23.063)
N-: NT2.2 SW1.3 SW1.4 | length 13.6
  Top Layer w0.2: SW1.4 SW1.3 66.142,42.799 66.821,42.12 66.821,36.437 67.862,35.395 67.862,33.572 67.488,33.198 NT2.2
NetC3_1: C3.1 C5.1 D1.2 U3.3
NetC10_1: C10.1 L1.1 U1.24 | length 10.3
  Top Layer w0.2: C10.1 43.51,19.366 43.51,24.316 U1.24
  Top Layer w0.254: C10.1 44.753,18.123 44.753,16.559 L1.1
NetC11_1: C11.1 L3.1 U1.43 | length 4.6
  Top Layer w0.2: U1.43 50.54,29.083 C11.1@53.086,29.083 ; C11.1 52.821,28.905 L3.1
NetC15_1: C15.1 R12.2 U6.1 | length 16.9
  Top Layer w0.3: v1(61.9,30.582) 61.95,30.632 62.534,30.632 62.731,30.829 U6.1 ; v1(67.856,38.163) R12.2 C15.1
  Bottom Layer w0.3: v1(61.9,30.582) 66.624,30.582 67.856,31.813 v1(67.856,38.163)
NetCN1_1: CN1.1 F1.1 | length 4
  Top Layer w1: CN1.1 F1.1
NetDS1_1: DS1.1 R3.1 | length 5.8
  Top Layer w0.3: DS1.1 32.944,26.543 33.401,26.086 R3.1
NetDS2_1: DS2.1 R8.2 | length 3.6
  Top Layer w0.254: DS2.1 17.41,26.695 R8.2
NetNT1_1: NT1.1 Q1.S R15.2 U6.3 | length 2.7
  Top Layer w0.2: U6.3@62.596,33.402 U6.3 ; R15.2 65.202,33.706 NT1.1
NetQ1_D: Q1.D R10.1 | length 7.2
  Top Layer w0.5: R10.1 59.006,34.902 59.817,35.712 59.817,37.211 60.306,37.7 Q1.D
NetQ1_G: Q1.G R13.1 | length 6.5
  Top Layer w0.2: R13.1 58.217,31.547 57.963,31.801 57.963,33.706 58.572,34.315 60.046,34.315 60.696,34.966 Q1.G
NetR4_2: R4.2 U2.1 | length 1.8
  Top Layer w0.254: R4.2 60.754,15.531 U2.1
NetR5_2: R5.2 U2.4 | length 1.8
  Top Layer w0.254: R5.2 60.754,11.721 U2.4
NetR11_1: R11.1 R14.3 | length 2.1
  Top Layer w0.3: R11.1 72.161,36.195 R14.3
NetR12_1: R12.1 R14.2 | length 2.3
  Top Layer w0.3: R12.1 71.803,38.163 R14.2
NetR13_2: R13.2 U6.4 | length 1.6
  Top Layer w0.3: R13.2@58.972,33.267 U6.4
NetR51_2: R51.2 R52.2 U5.1 | length 4.3
  Top Layer w0.254: R52.2 61.367,28.082 R51.2 62.902,26.961 62.775,26.834 U5.1
NetR55_2: R55.2 U5.4 | length 1.8
  Top Layer w0.254: R55.2 60.754,23.024 U5.4
OP1N: CN2.12 R19.1 R20.2 R21.2 U1.3 | length 30.8
  Top Layer w0.2: CN2.12 41.23,46.4 43.383,44.247 v1(43.383,36.703) 43.383,33.33 U1.3
  Bottom Layer w0.2: R20.2 37.771,41.594 R19.1 R21.2 37.771,37.489 38.557,36.703 v1(43.383,36.703)
OP1P: C16.2 CN2.13 R22.2 R23.2 R24.1 U1.2 | length 25.4
  Top Layer w0.2: CN2.13 44.018,50.752 v1(44.018,40.437) 44.044,40.411 44.044,33.236 U1.2
  Bottom Layer w0.2: C16.2 R22.2 R24.1 R23.2 42.431,40.513 42.507,40.437 v1(44.018,40.437)
OP1P+: R22.1 SW1.7 | length 25.9
  Top Layer w0.2: SW1.7 v1(58.674,41.529)
  Bottom Layer w0.2: R22.1 40.843,45.72 41.427,46.304 57.15,46.304 57.963,45.491 57.963,42.24 v1(58.674,41.529)
OPIN-: C16.1 R20.1 SW1.5 | length 27.3
  Top Layer w0.2: SW1.5 v1(58.649,44.069)
  Bottom Layer w0.2: R20.1 C16.1 39.389,45.917 40.183,46.711 57.658,46.711 58.649,45.72 v1(58.649,44.069)
P+: NT1.2 SW1.1 SW1.2 | length 10
  Top Layer w0.2: SW1.2 SW1.1 65.964,40.259 66.421,39.802 66.421,36.271 67.462,35.23 67.462,33.858 67.31,33.706 NT1.2
PGA3N: R18.2 SW1.6 | length 10.1
  Top Layer w0.2: v1(56.134,42.799) SW1.6
  Bottom Layer w0.2: R18.2 48.082,42.596 48.489,43.002 55.753,43.002 55.956,42.799 v1(56.134,42.799)
PGA3P: R17.2 SW1.8 | length 10
  Top Layer w0.2: v1(56.236,40.259) SW1.8
  Bottom Layer w0.2: R17.2 49.505,42.393 49.714,42.602 54.959,42.602 55.169,42.393 55.169,41.199 56.109,40.259 v1(56.236,40.259)
PWM1A/CANRX: CN6.6 R5.1 U1.20 | length 62.2
  Top Layer w0.2: CN6.6 25.99,5.924 27.091,7.025 34.945,7.025 40.521,12.601 40.521,20.785 v1(40.665,20.93) 40.763,21.027 40.763,23.831 U1.20
  Top Layer w0.254: v1(58.801,10.693) 58.801,11.546 58.838,11.583 R5.1
  Bottom Layer w0.254: v1(40.665,20.93) 53.645,20.93 57.125,17.45 57.125,12.37 v1(58.801,10.693)
PWM1B/GPIO1: CN6.5 DS2.2 U1.19 | length 73.2
  Top Layer w0.2: DS2.2 15.508,27.751 16.561,28.804 16.561,31.699 17.178,32.316 31.133,32.316 v1(31.928,31.521) 35.149,28.3 v1(35.149,25.28) ; CN6.5 23.45,6.305 24.67,7.525 34.737,7.525 40.021,12.809 40.021,23.511 v1(40.163,23.653) 40.163,23.797 U1.19
  Bottom Layer w0.2: v1(35.149,25.28) 36.776,23.653 v1(40.163,23.653)
PWM2A: CN6.9 U1.26 | length 33.7
  Top Layer w0.2: CN6.9 33.61,3.607 35.623,5.62 45.052,5.62 45.58,6.148 45.58,20.212 44.31,21.483 44.31,23.985 U1.26
PWM2B: CN6.10 U1.27 | length 31.6
  Top Layer w0.2: CN6.10 36.15,3.968 37.401,5.22 45.218,5.22 45.98,5.982 45.98,20.378 44.71,21.648 44.71,23.819 U1.27
PWM3A: CN6.11 U1.28 | length 29.3
  Top Layer w0.2: CN6.11 38.69,4.121 39.389,4.82 45.383,4.82 46.38,5.817 46.38,20.544 45.11,21.814 45.11,23.653 U1.28
PWM3B: CN6.13 U1.30 | length 24.7
  Top Layer w0.2: CN6.13 43.77,3.536 44.196,3.962 45.695,3.962 47.18,5.448 47.18,23.876 U1.30
PWM4A: CN6.14 U1.31 | length 23.2
  Top Layer w0.2: CN6.14 46.31,3.892 47.58,5.162 47.58,24.042 U1.31
PWM4B: CN6.15 U1.32 | length 23.4
  Top Layer w0.2: U1.32 47.981,24.208 47.981,5.232 48.85,4.363 CN6.15
PWM5A: CN6.16 U1.33 | length 25.4
  Top Layer w0.2: U1.33 48.381,24.373 48.381,5.398 49.25,4.529 50.589,4.529 51.39,3.728 CN6.16
PWM5B: CN6.12 U1.29 | length 26.3
  Top Layer w0.2: CN6.12 41.23,3.46 42.189,4.42 45.586,4.42 46.78,5.614 46.78,23.711 U1.29
SCIRXA: CN6.23 U1.42 | length 40.7
  Top Layer w0.2: U1.42 51.169,26.676 54.867,26.676 56.508,25.035 56.508,22.15 57.353,21.306 57.353,6.546 57.981,5.918 63.666,5.918 64.739,4.845 67.672,4.845 69.17,3.347 CN6.23
SCITXA: CN6.24 U1.44 | length 46.8
  Top Layer w0.2: U1.44 50.863,29.972 55.347,29.972 55.829,29.489 55.829,26.28 56.908,25.2 56.908,22.316 57.753,21.471 57.753,6.712 58.147,6.318 63.832,6.318 64.905,5.245 67.838,5.245 68.765,4.318 70.866,4.318 71.71,3.474 CN6.24
SIMOB: CN6.22 U1.41 | length 38.6
  Top Layer w0.2: U1.41 51.003,26.276 54.701,26.276 56.108,24.869 56.108,21.984 56.953,21.14 56.953,6.381 57.816,5.518 63.501,5.518 64.574,4.445 66.04,4.445 66.63,3.855 CN6.22
SLP: R49.2 R53.1 U5.2 | length 3.3
  Top Layer w0.254: R49.2 R53.1 61.008,25.564 U5.2
SOMIB: CN6.21 U1.40 | length 36.5
  Top Layer w0.2: U1.40 49.768,26.945 50.837,25.876 54.535,25.876 55.708,24.703 55.708,21.819 56.553,20.974 56.553,6.215 57.65,5.118 63.335,5.118 64.09,4.363 CN6.21
STB: CN6.8 R2.2 U1.25 U2.8 | length 82
  Top Layer w0.2: CN6.8 31.07,3.917 33.172,6.02 44.805,6.02 45.18,6.395 45.18,19.666 v1(44.704,20.142) 43.91,20.936 43.91,24.15 U1.25
  Top Layer w0.254: v1(62.14,20.865) 64.426,20.865 66.088,19.203 R2.2 66.088,16.155 66.712,15.531 U2.8
  Bottom Layer w0.2: v1(44.704,20.142) 53.67,20.142 56.698,17.115 56.698,11.4 58.115,9.982 60.63,9.982 63.144,12.497 63.144,19.861 v1(62.14,20.865)
STEB: CN6.19 U1.38 | length 31.3
  Top Layer w0.2: U1.38 50.544,25.038 54.242,25.038 54.908,24.372 54.908,21.487 55.753,20.643 55.753,5.884 57.319,4.318 58.166,4.318 59.01,3.474 CN6.19
TCK: CN2.1 CN3.9 CN3.11 U1.14 | length 65.9
  Top Layer w0.2: CN2.1 13.29,46.908 15.621,44.577 35.941,44.577 37.592,42.926 37.592,31.953 38.913,30.632 39.859,30.632 U1.14
  Bottom Layer w0.254: CN3.9 CN3.11 7.137,38.887 7.137,43.113 12.259,48.235 12.954,48.235 13.29,48.571 CN2.1
TDI: CN2.4 CN3.3 U1.11 | length 73.4
  Top Layer w0.2: CN2.4 20.91,47.289 22.25,45.949 36.509,45.949 38.948,43.51 38.948,32.294 39.298,31.944 40.244,31.944 U1.11
  Bottom Layer w0.254: CN3.3 7.62,27.432 8.509,28.321 8.509,42.545 12.827,46.863 18.415,46.863 20.91,49.358 CN2.4
TDO: CN2.2 CN3.7 U1.13 | length 69.1
  Top Layer w0.2: CN2.2 15.83,46.4 17.196,45.034 36.13,45.034 38.049,43.115 38.049,32.062 38.989,31.121 39.935,31.121 U1.13
  Bottom Layer w0.254: CN3.7 7.112,32.512 7.595,32.995 7.595,42.924 12.448,47.777 14.63,47.777 15.83,48.977 CN2.2
TMS: CN2.3 CN3.1 U1.12 | length 77.9
  Top Layer w0.2: CN2.3 18.37,46.908 19.787,45.491 36.32,45.491 38.506,43.305 38.506,32.17 39.133,31.544 40.078,31.544 U1.12
  Bottom Layer w0.254: CN3.1 4.572,26.162 4.572,28.194 5.08,28.702 7.239,28.702 8.052,29.515 8.052,42.734 12.638,47.32 16.84,47.32 18.37,48.85 CN2.3
TRSTn: CN2.24 CN3.2 R60.2 U1.45 | length 137.1
  Top Layer w0.2: U1.45 54.407,34.081 54.407,38.735 54,39.141 54,44.156 55.753,45.909 70.293,45.909 71.71,47.326 CN2.24 ; 54.407,36.754 54.472,36.819 R60.2
  Bottom Layer w0.3: CN3.2 1.143,27.051 1.143,42.672 3.302,44.831 6.731,44.831 8.509,46.609 8.509,50.927 9.906,52.324 70.386,52.324 CN2.24
VDD1: C12.1 U1.34 | length 4
  Top Layer w0.2: U1.34 49.352,23.967 C12.1
VDD2: C13.1 TP5.1 U1.22 | length 13.7
  Top Layer w0.2: C13.1 v1(42.113,19.914) 42.113,24.05 42.935,24.872 U1.22
  Bottom Layer w0.2: TP5.1 36.932,19.914 v1(42.113,19.914)
VDD5V: C1.1 C2.1 C4.1 C6.1 CN3.5 CN5.1 L1.2 L3.2 R3.2 R6.1 R7.1 R8.1 R10.2 R11.2 R49.1 R51.1 R62.1 TP1.1 U2.3 U2.5 U3.2 U6.5 | length 157.3
  Top Layer w0.2: 55.042,32.002 54.889,32.154 54.889,35.56 55.22,35.89 56.693,35.89 56.998,36.195 R62.1 ; R49.1 59.69,23.685 59.69,22.504 60.567,21.627 v1(63.918,21.627) ; v1(68.542,35.268) R11.2
  Top Layer w0.3: CN3.5 8.636,32.766 14.732,32.766 ; R6.1 14.859,32.893 14.732,32.766 ; R8.1 15.621,30.11 15.621,32.766 ; R7.1 28.045,32.871 27.94,32.766 ; 35.052,15.494 35.052,16.789 33.401,18.44 R3.2 34.227,20.79 35.799,22.362 35.799,28.747 31.78,32.766 27.94,32.766 ; C2.1 66.088,11.721 ; 14.732,32.766 15.621,32.766 ; 15.621,32.766 27.94,32.766
  Top Layer w0.4: C1.1 60.754,12.991 U2.3 v1(63.918,12.991) 64.353,12.991 65.623,11.721 66.088,11.721 U2.5
  Top Layer w0.6: v2(42.037,13.741) L1.2 ; L3.2 54.331,31.826 54.506,32.002 55.042,32.002 R10.2 56.439,31.14 57.023,30.556 60.325,30.556 ; v1(60.528,29.007) U6.5@60.528,31.314 ; 60.769,29.782 62.802,29.782 R51.1
  Bottom Layer w0.2: 62.916,27.33 66.827,27.33 68.542,29.045 v1(68.542,35.268)
  Bottom Layer w0.6: TP1.1 52.807,13.716 58.699,7.823 CN5.1 59.436,7.823 63.906,12.294 63.906,22.631 62.916,23.622 62.916,27.33 62.916,27.889 61.773,29.032 v1@60.528,29.032
VDDA: C9.1 R16.2 R24.2 TP3.1 U1.56 | length 25.9
  Top Layer w0.2: U1.56 47.473,33.37 v1(47.473,35.611) TP3.1 46.849,38.035 C9.1
  Bottom Layer w0.2: R24.2 40.843,38.202 41.072,37.973 45.11,37.973 TP3.1 ; v1(47.473,35.611) 52.324,35.611 53.746,37.033 53.746,39.929 53.288,40.387 R16.2
VM: C25.1 C26.1 D1.1 D2.2 F1.2 R25.1 U5.7 | length 154.7
  Top Layer w0.3: D2.2 2.794,17.907 1.143,19.558 1.143,42.672 3.302,44.831 6.731,44.831 8.509,46.609 8.509,50.927 9.906,52.324 73.988,52.324 75.692,50.62 75.692,32.588 73.838,30.734 66.444,30.734 66.088,30.378 C25.1
  Top Layer w0.4: C25.1 C26.1 ; R25.1 67.462,28.231 C26.1 ; U5.7 66.712,25.564 66.088,26.188 C26.1
X1: C39.2 CN6.17 U1.36 X1.3 | length 27.8
  Top Layer w0.2: U1.36 50.956,23.495 51.653,23.495 51.653,22.035 X1.3@51.742,21.946 ; X1.3 50.698,21.692 50.368,21.361 50.368,7.366 53.93,3.804 CN6.17
X2: C38.2 CN6.18 U1.37 X1.1 | length 30.8
  Top Layer w0.2: U1.37 50.379,24.638 54.077,24.638 54.508,24.206 54.508,20.091 54.163,19.746 X1.1@53.442,19.746 ; X1.1 53.213,17.918 C38.2 53.249,6.999 56.47,3.779 CN6.18 ; C38.2@53.442,18.172 C38.2@53.478,18.136
XRS: C47.2 CN2.23 R62.2 U1.46 | length 46.9
  Top Layer w0.2: U1.46 53.797,34.037 v1(53.797,36.043) 53.797,38.513 53.6,38.71 53.6,44.322 55.587,46.309 67.429,46.309 69.17,48.05 CN2.23 ; C47.2 55.016,39.624 55.169,39.472 56.794,39.472 56.998,39.268 R62.2 57.059,38.583 v1(57.912,38.583)
  Bottom Layer w0.2: v1(53.797,36.043) 54.356,36.601 54.356,37.897 55.042,38.583 v1(57.912,38.583)
pads on no net: CN3.6 CN3.13 CN3.14 M1.0 M2.0 M3.0 R14.0 U5.8

## Polygon pours and split planes (outlines as drawn)
GND on Top Layer "Top Layer-No Net 2" (solid, remove dead copper, pour order 77): 0,0 85,0 85,53 0,53
AGND on Top Layer "Top Layer-No Net" (solid, remove dead copper, pour order 73): 24.587,53 24.587,46.482 26.746,44.323 36.779,44.323 39.091,42.012 39.091,33.096 44.247,27.94 53.035,27.94 59.639,34.544 59.639,42.799 62.56,45.72 72.085,45.72 75.006,48.641 74.879,48.768 74.879,52.959 24.628,52.959
NetNT1_1 on Top Layer "Top Layer-No Net 1" (solid, pour order 67): 62.23,41.275 66.802,41.275 67.564,40.513 67.564,38.354 64.643,38.354 63.881,39.116 62.23,39.116
VM on Top Layer "Top Layer-No Net" (solid, pour order 48): 11.557,19.685 19.812,19.685 20.32,19.177 20.32,11.811 19.939,11.43 17.018,11.43 16.256,12.192 16.256,15.367 15.367,16.256 12.573,16.256 11.557,17.272
NetC3_1 on Top Layer "Top Layer-No Net" (solid, pour order 50): 21.209,17.526 21.209,19.558 20.447,20.32 17.272,20.32 16.51,21.082 16.51,26.543 17.018,27.051 24.003,27.051 24.511,26.543 24.511,22.352 23.114,20.955 23.114,18.034 22.606,17.526
VDD5V on Top Layer "Top Layer-No Net" (solid, remove dead copper, pour order 52): 23.622,20.447 23.622,17.272 22.86,16.51 21.717,16.51 20.828,15.621 20.828,11.684 35.433,11.684 36.449,12.7 36.449,15.24 35.941,15.748 26.162,15.748 25.146,16.764 25.146,20.447
NetNT1_1 on Top Layer "Top Layer-No Net 2" (solid, remove dead copper, pour order 69): 62.027,36.5 65.532,36.5 66.599,35.433 66.599,33.579 64.668,33.579 63.906,32.817 61.9,32.817 61.9,36.373
GND on Bottom Layer "Top Layer-No Net 2" (solid, remove dead copper, pour order 71): 0,0 85,0 85,53 0,53
AGND on Bottom Layer "Top Layer-No Net" (solid, remove dead copper, pour order 57): 24.638,53 24.638,46.482 26.797,44.323 36.83,44.323 39.141,42.012 39.141,33.096 40.259,31.979 57.125,31.979 59.69,34.544 59.69,42.799 62.611,45.72 72.136,45.72 75.057,48.641 74.93,48.768 74.93,52.959 24.679,52.959

## Keep-outs
Keep-Out Layer:
  the board outline again, w0.203

## Other copper
Top Layer:
  pour cut-out: 65.761,30.48 65.735,30.455 63.017,30.455 62.992,30.48 62.992,30.963 66.091,30.963 66.142,30.912 65.989,30.759 65.989,30.455 65.71,30.455 65.684,30.48
  pour cut-out: 63.678,32.512 63.678,31.039 63.754,30.963 63.906,30.963 63.906,32.512
  pour cut-out: 67.605,32.915 67.605,31.074 67.615,31.064 67.64,31.09 68.199,31.09 68.199,33.236 68.079,33.356 67.638,32.915

## Silkscreen, mask and mechanical layers (free items; w line width, h text height)
Top Overlay:
  lines w0.1: 57.277,45.568 57.683,45.568 ; 57.683,46.025 57.683,45.568 ; 61.697,29.261 61.697,29.972 62.281,30.556 66.294,30.556 66.573,30.836 ; 66.98,27.534 68.478,27.534 69.393,28.448 71.095,28.448 72.034,29.388 72.034,32.868 ; 53.848,45.39 49.682,45.39 49.276,44.983 49.276,39.929 49.784,39.421 53.696,39.421 54.229,39.954 54.229,45.009 53.848,45.39 ; 53.848,45.39 54.534,46.076 57.175,46.076 57.683,45.568
  lines w0.254: -12,0 0,0 ; -12,53 0,53 ; -6.508,1.524 -6,0 ; -6.508,51.476 -6,53 ; -6,21.41 -6,0 ; -6,31.59 -6,53 ; -5.492,1.524 -6,0 ; -5.492,51.476 -6,53 ; 0,-9 0,-1 ; 1.524,-5.508 0,-5 ; 1.524,-4.492 0,-5 ; 10.008,18.771 10.82,19.583 10.82,21.158 ; 31.369,23.114 32.131,23.876 33.401,23.876 ; 37.41,-5 0,-5 ; 47.59,-5 85,-5 ; 63.932,47.117 63.449,46.634 ; 63.983,46.101 63.449,46.634 ; 67.056,46.634 63.449,46.634 ; 76.938,47.601 77.729,47.601 ; 77.729,48.509 77.729,47.601 ; 77.974,46.718 cw(c76.175,46.694) 77.729,47.601 ; 83.476,-5.508 85,-5 ; 83.476,-4.492 85,-5 ; 85,-9 85,-1
  lines w0.305: 9.51,4.39 cw(c9.601,4.572) 9.601,4.369
  lines w0.381: 6.604,4.572 8.331,4.572 ; 9.601,4.572 10.236,4.572 11.811,4.572 ; 10.701,3.937 cw(c9.601,4.572) 10.701,5.207
  text "TCK" at 12.827,49.403 h1 r270
  text "TDO" at 15.358,49.403 h1 r270
  text "TMS" at 17.889,49.403 h1 r270
  text "TDI" at 20.42,49.403 h1 r270
  text "GPIO34" at 22.952,49.403 h1 r270
  text "B5" at 25.483,49.403 h1 r270
  text "B6" at 28.014,49.403 h1 r270
  text "B4" at 30.545,49.403 h1 r270
  text "B3" at 33.076,49.403 h1 r270
  text "B2" at 35.607,49.403 h1 r270
  text "B1" at 38.139,49.403 h1 r270
  text "OP1N" at 40.67,49.403 h1 r270
  text "OP1P" at 43.201,49.403 h1 r270
  text "B0" at 45.732,49.403 h1 r270
  text "A0" at 48.263,49.403 h1 r270
  text "A2" at 50.794,49.403 h1 r270
  text "A1" at 53.326,49.403 h1 r270
  text "A3" at 55.857,49.403 h1 r270
  text "A5" at 58.388,49.403 h1 r270
  text "A7" at 60.919,49.403 h1 r270
  text "A4" at 63.45,49.403 h1 r270
  text "A6" at 65.981,49.403 h1 r270
  text "XRS" at 68.513,49.403 h1 r270
  text "TRST" at 71.044,49.403 h1 r270
  text "ON" at 60.884,45.999 h1.2
  text "+" at 76.911,45.932 h1.8 r90
  text "OP1N" at 49.987,44.018 h0.9
  text "PGA3N" at 49.987,42.63 h0.9
  text "TZ3" at 16.002,42.545 h1.2
  text "TZ2" at 29.083,42.545 h1.2
  text "AGND" at 39.497,41.529 h1.2
  text "OP1P" at 49.987,41.241 h0.9
  text "PGA3P" at 49.987,39.853 h0.9
  text "VDDA" at 39.634,36.576 h1.2
  text "JTAG" at 9.906,35.814 h2 r270
  text "ADP32F036QN56Q" at 14.224,31.369 h1.8
  text "LIN" at 73.66,28.956 h1.2 r90
  text "Rev1.1" at 20.676,28.626 h1.8
  text "RUN" at 14.986,28.067 h1.2
  text "PWR" at 28.956,28.067 h1.2
  text "DC-12V" at 10.084,27.94 h1.2 r270
  text "GND" at 33.655,23.368 h1.2
  text "53 (mm)" at -4.687,21.664 h1.52 r90
  text "GND" at 73.66,18.796 h1.2 r90
  text "H" at 73.914,16.637 h1.5 r90
  text "VDD" at 34.493,16.002 h1.2
  text "VDD5V" at 32.766,10.668 h1.2
  text "L" at 73.914,9.652 h1.5 r90
  text "+5V" at 57.581,9.489 h0.9
  text "GND" at 60.781,9.489 h0.9
  text "PWM2A" at 33.119,8.507 h1 r270
  text "PWM3A" at 38.186,8.507 h1 r270
  text "PWM4A" at 45.786,8.507 h1 r270
  text "PWM5A" at 50.853,8.507 h1 r270
  text "PWM2B" at 35.653,8.412 h1 r270
  text "PWM5B" at 40.72,8.412 h1 r270
  text "PWM3B" at 43.253,8.412 h1 r270
  text "PWM4B" at 48.32,8.412 h1 r270
  text "GPIO33" at 30.586,8.359 h1 r270
  text "PWM1B" at 22.986,8.255 h1 r270
  text "CANRX" at 25.519,8.255 h1 r270
  text "GPIO17" at 17.919,8.202 h1 r270
  text "GPIO16" at 20.453,8.155 h1 r270
  text "CANTX" at 28.053,8.15 h1 r270
  text "LINRXA" at 15.386,8.14 h1 r270
  text "LINTXA" at 12.852,8.036 h1 r270
  text "SCIRX" at 68.587,7.417 h1 r270
  text "SCITX" at 71.12,7.312 h1 r270
  text "SOMI" at 63.52,6.698 h1 r270
  text "SIMO" at 66.053,6.674 h1 r270
  text "CLK" at 60.986,6.108 h1 r270
  text "STE" at 58.453,6.06 h1 r270
  text "-" at 7.747,5.461 h1.02 r90
  text "+" at 12.065,5.334 h1.02 r90
  text "X2" at 55.92,5.322 h1 r270
  text "X1" at 53.386,4.894 h1 r270
  text "85 (mm)" at 37.664,-6.313 h1.52
Bottom Overlay:
  circle w0.2: c55.556,25.389 r1.25
  region: 57.252,22.047 34.265,22.047 34.265,17.145 57.252,17.145
  text "WWW.advancechip.com" at 56.667,30.099 h1.52
  text "Contact:0731-88731029" at 56.591,27.534 h1.52
  text "1" at 66.065,25.146 h2.54
  text "C" at 56.09,24.678 h1.52
  text "Advancechip Co.,LTD" at 53.442,24.663 h1.52
  text "N" at 27.33,21.692 h3
  text "S/N" at 63.094,18.593 h2
Drill Drawing:
  text ".Legend" at 8.509,-11.176 h5.08

## Text inside footprints (layer, text, board x,y; h text height)
SW1: Top Overlay "ON" at 59.448,40.33 h0.33; Top Overlay "ON" at 59.448,44.14 h0.33; Top Overlay "ON" at 59.448,42.87 h0.33; Top Overlay "ON" at 59.448,41.6 h0.33